# Altium PCB Digit_input.PcbDoc
Units mm, origin at the board's own origin, x right, y up, seen from the top; angles counter-clockwise.
Board outline 58 x 31.1 mm, 2 copper layers (Top Layer, Bottom Layer), stack 1.335 mm thick; 59 components, 17 nets, 128 pads, 167 vias.
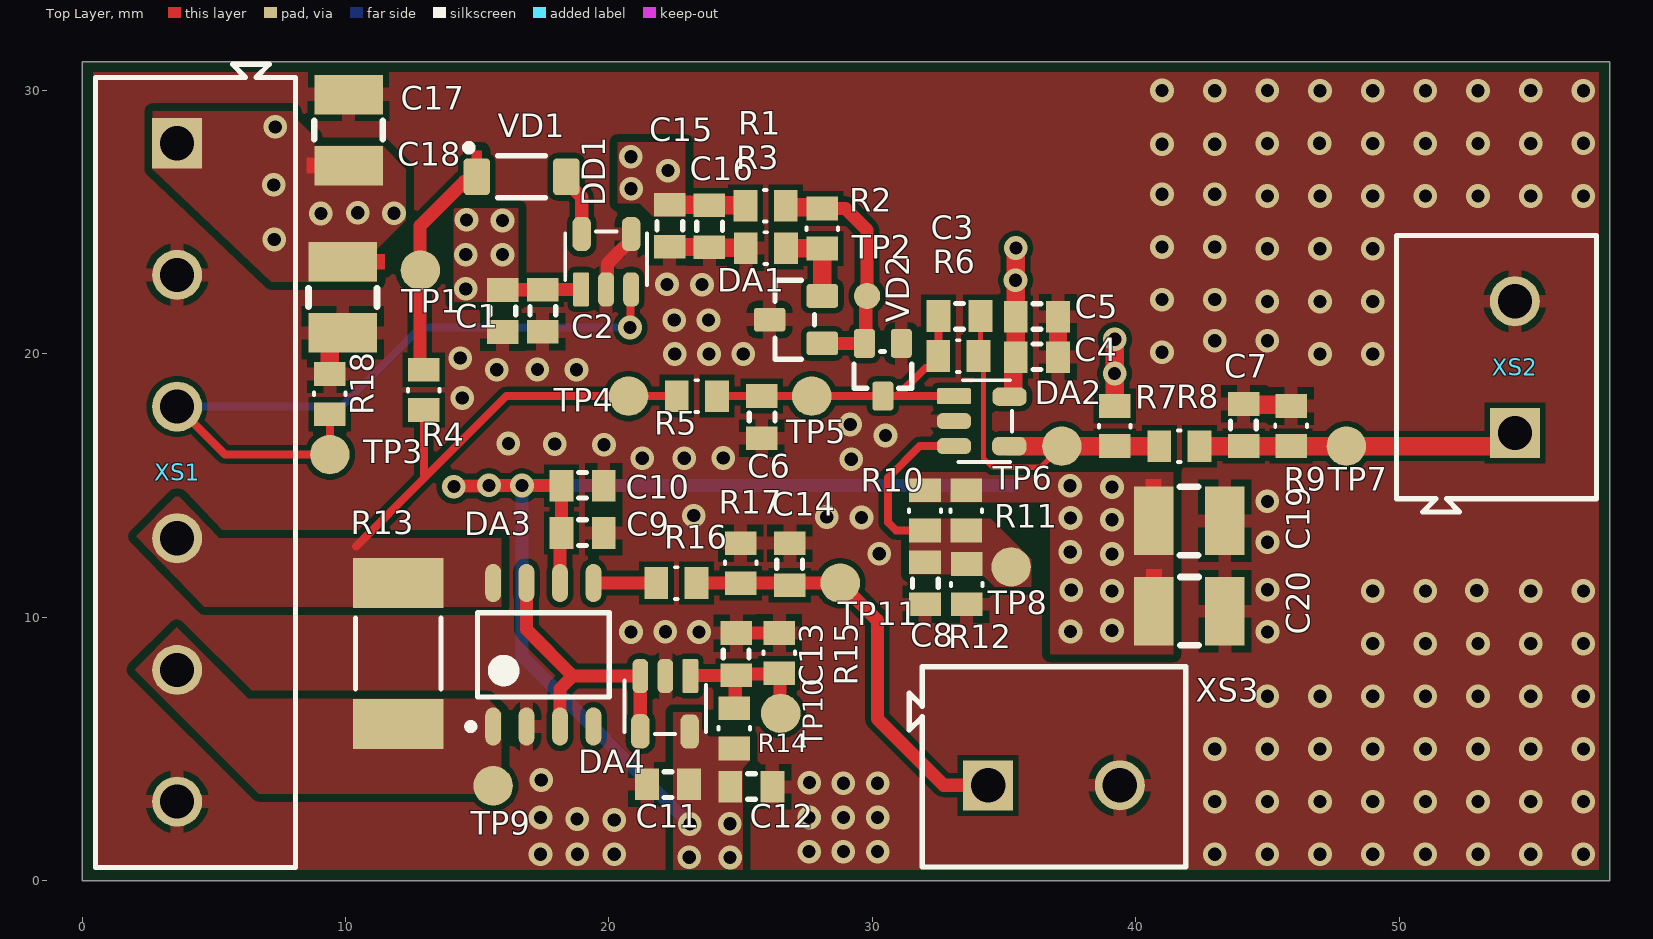
[diagram p0: Top Layer view]
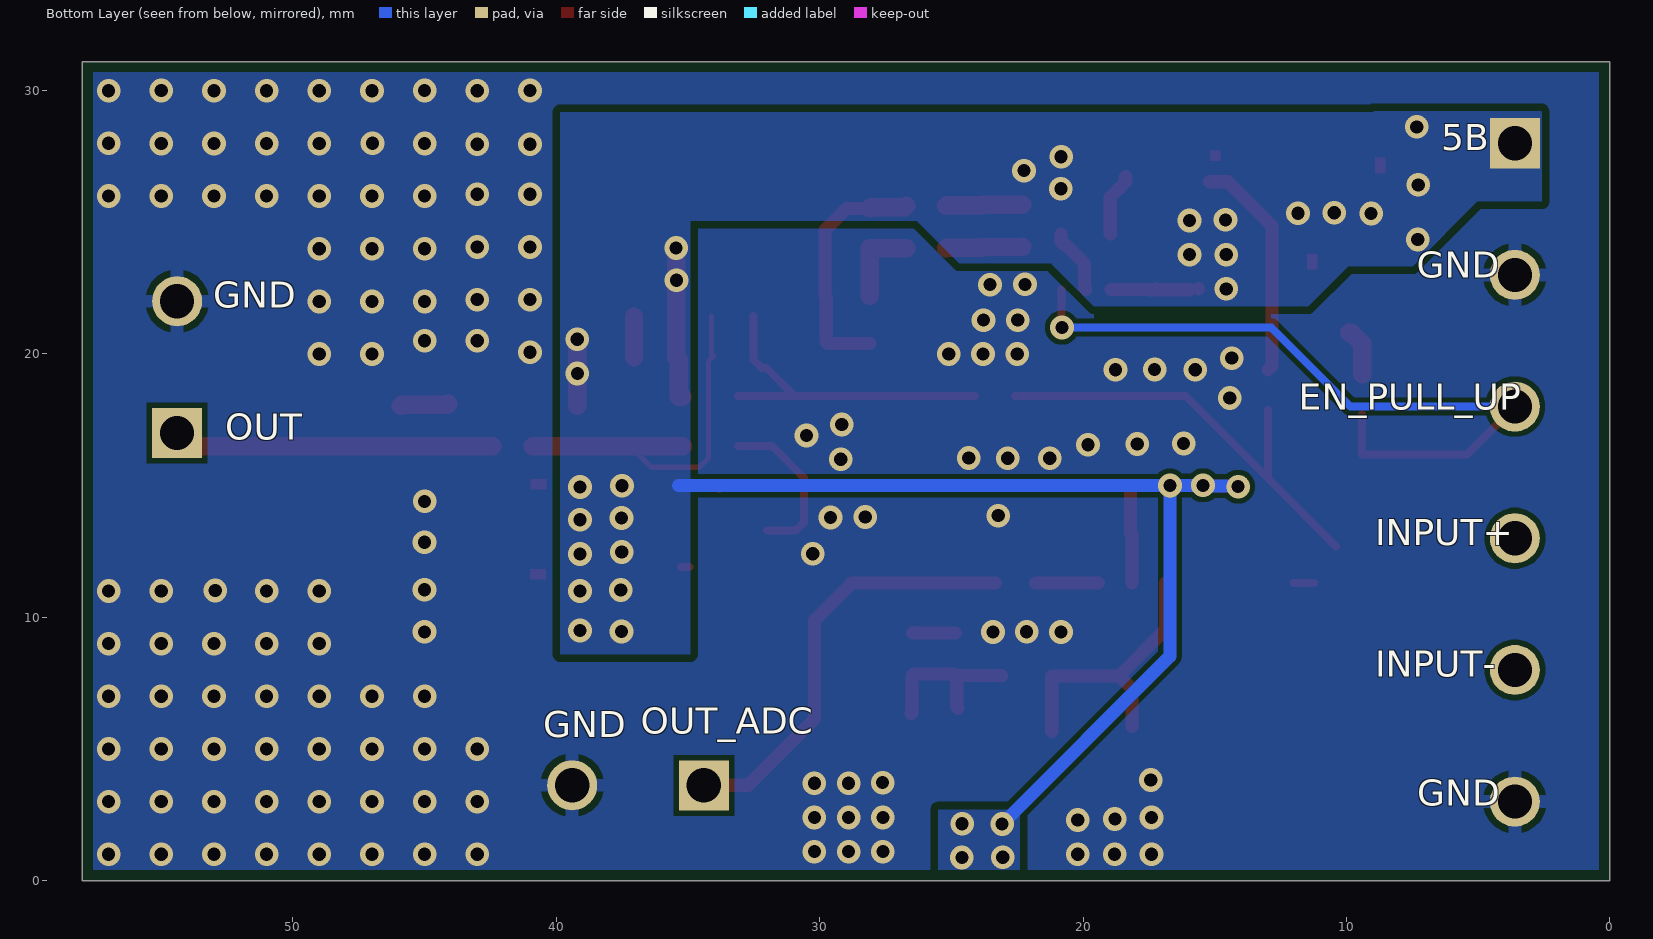
[diagram p1: Bottom Layer view, seen from below]
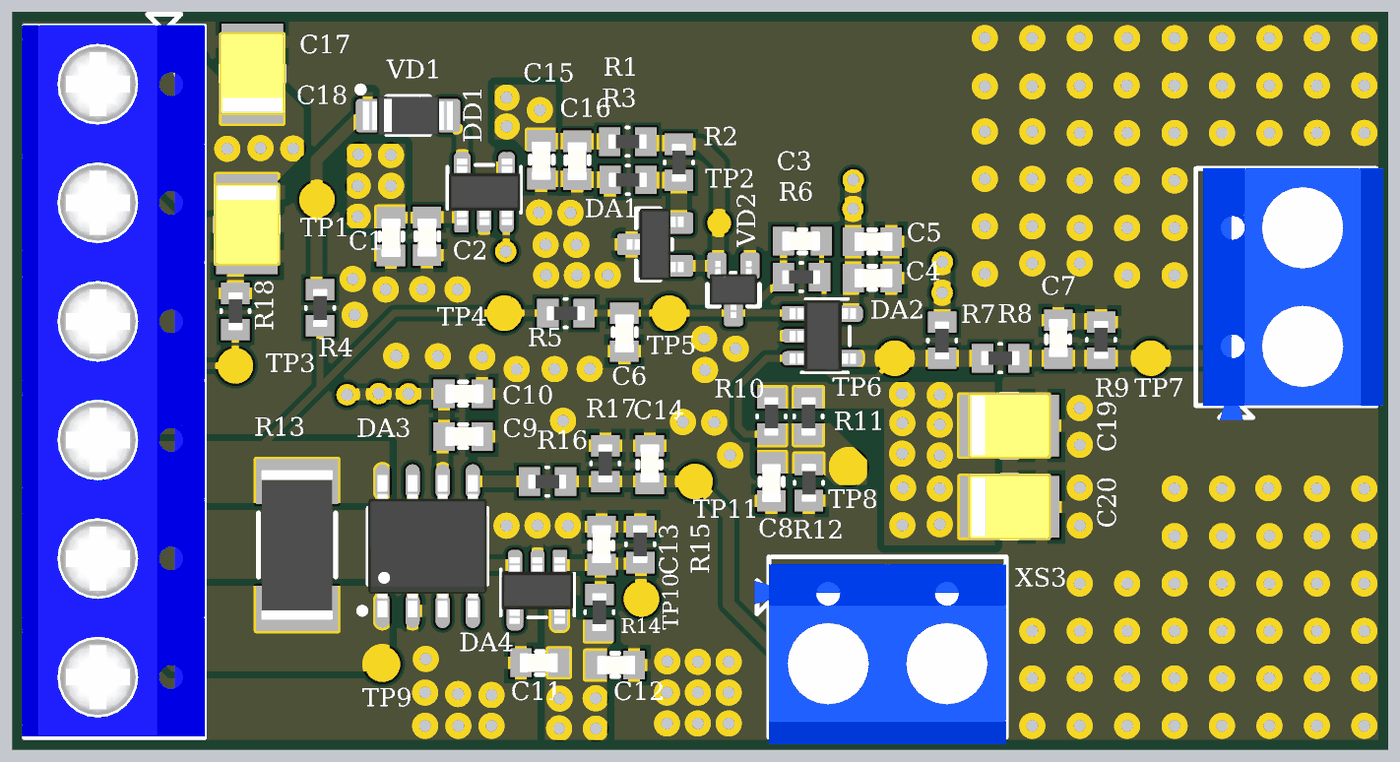
[diagram p2: 3D render of the assembled board from above, using the file's embedded part models]

## Layer stack, top to bottom
Top Solder: solder mask 0.0102, Solder Resist, Dk 3.5
Top Layer: signal copper 0.035
Dielectric 1: dielectric 1.265, FR-4, Dk 4.6
Bottom Layer: signal copper 0.035
Bottom Solder: solder mask 0.0102, Solder Resist, Dk 3.5

## Board outline
0,0 58,0 58,31.1 0,31.1

## Design rules (kind name [scope] priority, off if disabled: settings)
BoardOutlineClearance [All] p1: gap=0.4 ignorepadtopadclearanceinfootprint=FALSE except(0: Arc-SplitContinuation Track-SplitContinuation SMDPad-SplitContinuation THPad-SplitContinuation Via-SplitContinuation Fill-SplitContinuation Poly-SplitContinuation Region-SplitContinuation Text-SplitContinuation)
Clearance Clearance_INPUT+ [InNet('INPUT+') vs InNet('INPUT+')] p1: gap=0.2 ignorepadtopadclearanceinfootprint=FALSE except(0: Arc-SMDPad Arc-THPad Arc-Via Arc-Hole Track-SMDPad Track-THPad Track-Via Track-Hole SMDPad-Via SMDPad-Hole THPad-Hole Via-Hole Fill-Hole Poly-Hole Region-Hole Text-Hole; 0.254: Arc-Arc Arc-Track Arc-Text Track-Track Track-Text SMDPad-SMDPad SMDPad-THPad SMDPad-Text THPad-THPad THPad-Via THPad-Text Via-Via Via-Text Fill-Text Poly-Text Region-Text Text-Text; 0.3: Fill-Fill Fill-Poly Fill-Region Poly-Poly Poly-Region Region-Region)
Clearance Clearance_DEF [All] p2: gap=0.2 ignorepadtopadclearanceinfootprint=FALSE except(0: Arc-Hole Track-Hole SMDPad-Via SMDPad-Hole THPad-Hole Via-Hole Fill-Hole Poly-Hole Region-Hole Text-Hole; 0.1: Arc-SMDPad Arc-THPad Track-SMDPad Track-THPad; 0.254: Arc-Arc Arc-Track Arc-Text Track-Track Track-Text SMDPad-SMDPad SMDPad-THPad SMDPad-Text THPad-THPad THPad-Via THPad-Text Via-Via Via-Text Fill-Text Poly-Text Region-Text Text-Text; 0.3: Fill-Fill Fill-Poly Fill-Region Poly-Poly Poly-Region Region-Region)
Height [All] p1: minheight=0 maxheight=70 prefheight=35
MinimumSolderMaskSliver [All] p1: minsoldermaskwidth=0.1
PolygonConnect PolygonConnect_Vref_comp [InNet('Vref_comp') vs InNet('Vref_comp')] p1: thpad.connectstyle=Relief thpad.reliefconductorwidth=0.254 thpad.reliefentries=4 thpad.polygonreliefangle="90 Angle" thpad.airgapwidth=0.254 smdpad.connectstyle=Direct smdpad.reliefconductorwidth=0.254 smdpad.reliefentries=4 smdpad.polygonreliefangle="90 Angle" smdpad.airgapwidth=0.254 via.connectstyle=Relief via.reliefconductorwidth=0.254 via.reliefentries=4 via.polygonreliefangle="90 Angle" via.airgapwidth=0.254
PolygonConnect PolygonConnect_GND [InNet('GND')] p2: thpad.connectstyle=Relief thpad.reliefconductorwidth=0.508 thpad.reliefentries=4 thpad.polygonreliefangle="90 Angle" thpad.airgapwidth=0.254 smdpad.connectstyle=Relief smdpad.reliefconductorwidth=0.508 smdpad.reliefentries=4 smdpad.polygonreliefangle="90 Angle" smdpad.airgapwidth=0.254 via.connectstyle=Direct via.reliefconductorwidth=0.254 via.reliefentries=4 via.polygonreliefangle="90 Angle" via.airgapwidth=0.254
PolygonConnect PolygonConnect_5В [InNet('5В') vs InNet('5В')] p3: connectstyle=Direct reliefconductorwidth=0.254 reliefentries=4 polygonreliefangle="90 Angle" airgapwidth=0.254
PolygonConnect PolygonConnect_INPUT- [InNet('INPUT-') vs InNet('INPUT-')] p4: connectstyle=Direct reliefconductorwidth=0.254 reliefentries=4 polygonreliefangle="90 Angle" airgapwidth=0.254
PolygonConnect PolygonConnect_INPUT+ [InNet('INPUT+')] p5: connectstyle=Direct reliefconductorwidth=0.254 reliefentries=4 polygonreliefangle="90 Angle" airgapwidth=0.254
PolygonConnect PolygonConnect_1 [All] p6: connectstyle=Relief reliefconductorwidth=0.508 reliefentries=4 polygonreliefangle="90 Angle" airgapwidth=0.254
RoutingVias [All] p1: holewidth=1.2 width=2.5 viastyle="Through Hole" minholewidth=0.5 minwidth=0.8 maxholewidth=3 maxwidth=5
SilkToSolderMaskClearance [IsPad] p1: minsilkscreentomaskgap=0.15 clearancetoexposedcopper=TRUE
SolderMaskExpansion [All] p1: expansion=0.102 istentingtop=FALSE
SupplyNets "Schematic Supply Nets_1" [InNet('GND')] p1: voltage=0.000
SupplyNets "Schematic Supply Nets" [InNet('5В')] p2: voltage=0.000
Width [All] p1: maxlimit=2.5 minlimit=0.15 preferedwidth=0.8
27 further rules are at their usual default settings.

## Components (designator, comment, footprint, x,y, rotation, side; value= is the part's Value field where it differs from the comment)
C1 "100 нФ" "CAP 0603 3D" 15.96,22.43 r0 top
C2 "100 нФ" "CAP 0603 3D" 17.48,22.44 r0 top
C3 "100 пФ" "CAP 0603 3D" 34.11,21.44 r270 top
C4 "100 нФ" "CAP 0603 3D" 35.45,19.88 r90 top
C5 "100 нФ" "CAP 0603 3D" 35.45,21.41 r90 top
C6 "1 нФ" "CAP 0603 3D" 25.8,18.4 r0 top
C7 "100 пФ" "CAP 0603 3D" 44.1,16.5 r180 top
C8 "100 нФ" "CAP 0603 3D" 32,12.09 r0 top
C9 "100 нФ" "CAP 0603 3D" 18.2,13.2 r90 top
C10 "100 нФ" "CAP 0603 3D" 18.2,15 r90 top
C11 "100 нФ" "CAP 0603 3D" 23.04,3.66 r270 top
C12 "100 нФ" "CAP 0603 3D" 24.61,3.56 r90 top
C13 "100 нФ" "CAP 0603 3D" 24.84,7.8 r180 top
C14 "1 нФ" "CAP 0603 3D" 26.87,11.214 r180 top
C15 "100 нФ" "CAP 0603 3D" 22.3,25.67 r0 top
C16 "100 нФ" "CAP 0603 3D" 23.81,25.65 r0 top
C17 "15 мкФ" "Tant B"#1 10.11,27.25 r180 top
C18 "15 мкФ" "Tant B"#1 9.89,23.4 r0 top
C19 "15 мкФ" "Tant B"#2 40.78,13.66 r90 top
C20 "15 мкФ" "Tant B"#1 40.79,10.23 r90 top
DA1 "TL431" "SOT-23-3 (132)" 28.1,20.4 r90 top
DA2 "LMV331" SOT-23-5#1 33.125,18.4 r0 top
DA3 "AD8418" "SOIC-8 150mil" 17.505,8.575 r90 top
DA4 "MCP6001UT" SOT-23-5#1 23.09,7.745 r270 top
DD1 "UCC27517" SOT-23-5#2 18.94,22.475 r90 top
R1 "100 Ом" "Res_0603 3D" 25.186,25.63 r90 top
R2 "1 кОм" "Res_0603 3D" 28.1,24 r180 top
R3 "3 кОм" "Res_0603 3D" 25.196,24.02 r90 top
R4 "2 кОм" "Res_0603 3D" 12.97,17.87 r180 top
R5 "15 кОм" "Res_0603 3D" 22.576,18.4 r90 top
R6 "1 МОм" "Res_0603 3D" 32.506,19.92 r90 top
R7 "3 кОм" "Res_0603 3D" 39.2,16.5 r180 top
R8 "10 кОм" "Res_0603 3D" 40.9,16.5 r90 top
R9 "20 кОм" "Res_0603 3D" 45.9,18.024 r0 top
R10 "13 кОм" "Res_0603 3D" 32,13.296 r180 top
R11 "1 МОм" "Res_0603 3D" 33.56,13.296 r180 top
R12 "13 кОм" "Res_0603 3D" 33.58,10.496 r180 top
R13 "0.1 Ом" "Res_2512 3D" 12.05,5.975 r180 top
R14 "1 кОм" "Res_0603 3D" 24.75,6.542 r0 top
R15 "1 кОм" "Res_0603 3D" 26.47,9.404 r0 top
R16 "2 кОм" "Res_0603 3D" 21.8,11.3 r90 top
R17 "3.83 кОм" "Res_0603 3D" 25,12.814 r0 top
R18 "10 кОм" "Res_0603 3D" 9.4,19.234 r0 top
TP1 "TP" Test_Point_1_5mm 12.84,23.18 r90 top
TP2 "TP" Test_Point_1mm 29.8,22.2 r90 top
TP3 "TP" Test_Point_1_5mm 9.4,16.18 r90 top
TP4 "TP" Test_Point_1_5mm 20.743,18.4 r90 top
TP5 "TP" Test_Point_1_5mm 27.7,18.4 r0 top
TP6 "TP" Test_Point_1_5mm 37.2,16.5 r90 top
TP7 "TP" Test_Point_1_5mm 48,16.5 r90 top
TP8 "TP" Test_Point_1_5mm 35.27,11.91 r90 top
TP9 "TP" Test_Point_1_5mm 15.6,3.6 r90 top
TP10 "TP" Test_Point_1_5mm 26.52,6.35 r90 top
TP11 "TP" Test_Point_1_5mm 28.78,11.3 r90 top
VD1 "BAS70H" SOD-123f 14.98,26.73 r90 top
VD2 "BAS70-04W" SOT-323 31.1,20.4 r180 top
XS1 "KF-301-6P" Degson_DG301-5.0-06P-1X 3.6,28 r270 top
XS2 "KF-301-2P" Degson_DG301-5.0-02P-1X 54.4,17 r90 top
XS3 "KF-301-2P" Degson_DG301-5.0-02P-1X 34.398,3.62 r0 top

## Footprints (in the part's own frame and the unit in brackets; to place one, negate y for a bottom-side part, rotate by r counter-clockwise, add the part's x,y. Pads: shape width x height; smd on the part's side, far side on the other; paste and mask are expansions set on the pad)
"CAP 0603 3D" [mm] "Конденсатор керамический ЧИП (SMD)"
  rect 1.2x0.9 smd: 1(0,0) 2(0,-1.6)
  silkscreen extent -0.48,-0.95 0.5,-0.65, body extent -0.4,-1.65 0.4,-0.05, height 0.86
Degson_DG301-5.0-02P-1X [mm]
  rect 1.9x1.9 hole 1.3 mask+0.102: 1(0,0)
  round 1.9 hole 1.3 mask+0.102: 2(5,0)
  silkscreen extent -3,-3.1 7.5,4.5, body extent -3.1,-3.4 7.5,4.2, height 10
Degson_DG301-5.0-06P-1X [mm]
  rect 1.9x1.9 hole 1.3 mask+0.102: 1(0,0)
  round 1.9 hole 1.3 mask+0.102: 2(5,0) 3(10,0) 4(15,0) 5(20,0) 6(25,0)
  silkscreen extent -3,-3.1 27.5,4.5, body extent -2.55,-3.2 27.45,4.5, height 10.25
"Res_0603 3D" [mm] "Резистор ЧИП (SMD)"
  rect 1.2x0.9 smd: 1(0,0) 2(0,-1.524)
  silkscreen extent -0.6,-0.8 0.6,-0.7, body extent -0.3,-1.55 0.3,0.05, height 0.63
"Res_2512 3D" [mm] "Резистор ЧИП (SMD)"
  rect 3.45x1.9 smd: 1(0.05,0.025) 2(0.05,-5.325)
  silkscreen extent -1.58,-4 1.67,-1.3, body extent -1.45,-5.8 1.55,0.5, height 0.7
SOD-123f [mm]
  rrect30% 1.4x1 smd: 1(0,0) 2(0,-3.4)
  Top Layer region: 0.599,-0.199 0.999,-0.199 0.999,0.201 0.599,0.201
  silkscreen extent -0.8,-2.6 1.23,0.43, body extent -0.8,-3.6 0.8,0.2, height 1.15
"SOIC-8 150mil" [mm]
  oval 1.45x0.6 smd: 1(-2.725,1.905) 2(-2.725,0.635) 3(-2.725,-0.635) 4(-2.725,-1.905) 5(2.725,-1.905) 6(2.725,-0.635) 7(2.725,0.635) 8(2.725,1.905)
  silkscreen extent -2.85,-2.5 1.6,2.88, body extent -3,-2.5 3,2.5, height 1.75
"SOT-23-3 (132)" [mm] "TO-236AB,   SuperSOT-3,  SOT-346,  KT-46,  SC-59,  SMT3"
  rrect25% 0.9x1.2 smd: 1(0,0) 2(1.8,0) 3(0.9,2)
  silkscreen extent -0.6,0.3 2.4,1.8, body extent -0.6,-0.2 2.4,2.2, height 1
SOT-23-5#1 [mm]
  rrect20% 1.3x0.6 smd: 1(-0.025,0)
  rrect70% 1.3x0.6 smd: 2(-0.025,-0.95) 3(-0.025,-1.9)
  rrect70% 1.3x0.7 smd: 4(2.075,-1.9) 5(2.083,-0.025)
  silkscreen extent 0.15,-2.5 2.17,0.6, body extent -0.36,-2.47 2.44,0.53, height 1
SOT-23-5#2 [mm]
  rrect20% 1.3x0.6 smd mask+0.102: 1(-0.025,0)
  rrect70% 1.3x0.6 smd mask+0.102: 2(-0.025,-0.95) 3(-0.025,-1.9)
  rrect70% 1.3x0.7 smd mask+0.102: 4(2.075,-1.9) 5(2.083,-0.025)
  silkscreen extent 0.15,-2.5 2.17,0.6, body extent -0.36,-2.47 2.44,0.53, height 1
SOT-323 [mm] "SC-70-3"
  rrect30% 0.8x1.1 smd: 1(0,0) 2(0.7,2) 3(1.4,0)
  silkscreen extent -0.4,0.3 1.8,1.7, body extent -0.3,-0.2 1.7,2.2, height 1
"Tant B"#1 [mm] "Конденсатор тантал ЧИП (SMD)"
  rect 2.6x1.5 smd: 1(0,0.1) 2(0,-2.6)
  Top Layer region: 1.2,0.4 1.2,-0.2 1.6,-0.2 1.6,0.4
  silkscreen extent -1.3,-1.6 1.3,-0.9, body extent -1.4,-3 1.4,0.5, height 1.9
"Tant B"#2 [mm] "Конденсатор тантал ЧИП (SMD)"
  rect 2.6x1.5 smd: 1(0,0.1)
  rect 2.6x1.5 smd paste+0: 2(0,-2.6)
  Top Layer region: 1.2,0.4 1.2,-0.2 1.6,-0.2 1.6,0.4
  silkscreen extent -1.3,-1.6 1.3,-0.9, body extent -1.4,-3 1.4,0.5, height 1.9
Test_Point_1_5mm [mm]
  round 1.5 smd paste-0.75: 1(0,0)
  body extent -0.75,-0.75 0.75,0.75, height 0.03
Test_Point_1mm [mm]
  round 1 smd paste-0.5: 1(0,0)
  body extent -0.5,-0.5 0.5,0.5, height 0.03

## Part data
C1 C2 C3 C4 C5 C6 C7 C8 C9 C10 C11 C12 C13 C14 C15 C16: library part C, "Конденсатор керамика"
C17 C18 C19 C20: library part "C T", "Конденсатор тантал"
DA1: library part "TL431 (SOT-23-3)", "Управляемый стабилитрон Uref=2.5V"
DA4: library part LMV331
R1 R2 R3 R4 R5 R6 R7 R8 R9 R10 R11 R12 R13 R14 R15 R16 R17 R18: library part R, "Резисторы плёночные (SMD; МЛТ; С2-33Н; MP9xxx)"
VD1: library part "Диод Шот. х1", "Диод Шоттки одиночный"
VD2: library part "Диод Шот  А1&К2 (2)", "Диод Шоттки х2 Общ. катод-анод"

## Via types
v1: diameter 0.9, hole 0.5, Top Layer to Bottom Layer, 167 vias

## Nets (pads, with @x,y where several pads share a name; then routed paths per layer and width w, separated by ;. In a path a pad name is that pad's centre, name@x,y a point inside that pad or via, vN(x,y) a via of type N, cw(c..) or ccw(c..) an arc to the next point about the centre after c; other vN are vias at no path point)
4В5: DA1.1 R1.2 R2.2 TP2.1 VD2.3 | length 9.4
  Top Layer w0.3: VD2.3 VD2.3@29.75,20.45 ; TP2.1@29.75,22.15 TP2.1
  Top Layer w0.5: DA1.1 VD2.3 ; R2.2 28.976,25.524 29.8,24.7 TP2.1 ; VD2.3@29.75,20.45 TP2.1@29.75,22.15
  Top Layer w0.7: R1.2 26.763,25.577 28.047,25.577 R2.2
5В: C1.1 C2.1 C4.1 C5.1 C9.1 C10.1 C11.1 C12.1 C15.1 C16.1 C17.1 C18.1 C19.1 C20.1 DA2.5 DA3.6 DA4.5 DD1.1 R1.1 R7.2 R10.2 R11.2 R14.2 XS1.1 | length 59
  Top Layer w0.2: R11.2@33.8,14.824 R11.2@33.849,14.873
  Top Layer w0.3: C9.1@18.14,13.14 C9.1
  Top Layer w0.5: v1(14.11,14.96) 14.135,14.985 15.415,14.985 v1(15.44,15.01) 15.445,15.005 16.695,15.005 v1(16.7,15) C10.1 C9.1 ; C1.1@15.61,22.48 C1.1@15.62,22.47 ; C1.1 15.965,22.435 C2.1@17.475,22.435 ; C2.1@17.2,22.47 C2.1@17.21,22.48 ; C2.1 17.485,22.445 18.935,22.445 DD1.1 ; DA3.6 C9.1@18.14,13.14
  Top Layer w0.7: C15.1 22.31,25.66 23.8,25.66 C16.1 23.82,25.64 25.176,25.64 R1.1 ; DA2.5 35.35,18.375 35.35,19.78 C4.1 C5.1 35.445,21.415 35.445,22.795 v1(35.44,22.8) 35.445,22.805 35.445,24.015 v1(35.45,24.02) ; R7.2 v1(39.2,19.26) 39.204,19.264 39.204,20.553 v1(39.208,20.557)
  Bottom Layer w0.5: v1(14.11,14.96) 14.135,14.985 15.415,14.985 v1(15.44,15.01) v1(16.7,15) ; v1(23.07,2.15) 16.7,8.52 v1(16.7,15) ; 35.365,15 v1(16.7,15)
  other v1: 23.05,0.89 24.6,0.88 24.59,2.16 37.523,9.457 39.1,9.5 39.1,11 37.553,11.037 39.1,12.4 37.513,12.477 39.1,13.7 37.523,13.767 39.1,14.95 37.503,14.997 14.56,22.47 14.56,23.77 15.96,23.77 7.29,24.342 15.96,25.07 14.588,25.09 9.06,25.33 10.46,25.36 11.84,25.34 20.84,26.27 7.27,26.42 22.24,26.96 20.83,27.49 7.33,28.622
EN_PULL_UP: DD1.3 R18.2 TP3.1 XS1.3 | length 28
  Top Layer w0.3: XS1.3 5.42,16.18 TP3.1 R18.2 ; v1(20.8,21) 20.82,21.02 20.82,22.43 DD1.3
  Bottom Layer w0.3: XS1.3 9.85,18 12.85,21 v1(20.8,21)
GND: C1.2 C2.2 C4.2 C5.2 C6.2 C7.2 C8.2 C9.2 C10.2 C11.2 C12.2 C13.2 C14.2 C15.2 C16.2 C17.2 C18.2 C19.2 C20.2 DA1.3 DA2.2 DA3.2 DA4.2 DD1.2 DD1.4 R3.1 R9.1 R12.1 R15.1 R17.1 R18.1 VD2.1 XS1.2 XS1.6 XS2.2 XS3.2 | length 12.3
  Top Layer w0.5: DD1.2 19.94,22.5 19.94,23.43 20.66,24.15 20.74,24.15 20.84,24.25 DD1.4 ; C13.2 24.842,9.402 26.468,9.402 R15.1 ; R15.1@26.378,9.422 R15.1@26.38,9.424
  Top Layer w0.7: R18.1 9.4,20.4 9.8,20.8 C18.2 ; C15.2 22.31,24.06 23.8,24.06 C16.2 23.825,24.035 25.181,24.035 R3.1 ; C4.2 C5.2 ; C7.2 44.138,18.062 45.862,18.062 R9.1
  other v1: 17.4,1 18.8,1 20.2,1 43,1 45,1 47,1 49,1 51,1 53,1 55,1 57,1 27.6,1.1 28.9,1.1 30.2,1.1 20.2,2.3 18.79,2.34 17.4,2.4 27.6,2.4 28.9,2.4 30.2,2.4 43,3 45,3 47,3 49,3 51,3 53,3 55,3 57,3 27.61,3.72 28.9,3.7 30.2,3.7 17.43,3.82 43,5 45,5 47,5 49,5 51,5 53,5 55,5 57,5 45,7 47,7 49,7 51,7 53,7 55,7 57,7 49,9 51,9 53,9 55,9 57,9 20.833,9.438 22.14,9.45 23.42,9.44 45.007,9.446 49,11 51,11 55,11 57,11 52.953,11.02 45.007,11.046 30.26,12.41 45.007,12.846 29.59,13.79 28.27,13.81 23.218,13.86 45,14.4 29.2,16 21.26,16.04 22.86,16.04 24.34,16.05 19.81,16.55 17.94,16.58 16.18,16.6 30.5,16.9 29.162,17.322 14.43,18.33 15.74,19.4 17.28,19.41 18.77,19.4 14.35,19.84 22.5,20 23.8,20 25.1,20 47,19.994 49,19.994 41.002,20.062 43,20.5 45,20.5 22.479,21.282 23.779,21.282 45,21.994 47,21.994 49,21.994 41.002,22.062 43.002,22.062 22.2,22.64 23.53,22.63 45,23.994 47,23.994 49,23.994 41.002,24.062 43.002,24.062 45,25.994 47,25.994 49,25.994 51,25.994 53,25.994 55,26 57,26 41.002,26.062 43.002,26.062 41.002,27.962 43.002,27.962 45,27.994 46.981,28.001 49,27.994 51,27.994 53,27.994 55,27.994 57,28 41,30 43,29.994 45,30 47,29.994 49,29.994 51,29.994 53,29.994 55,30 57,29.994
INPUT+: DA3.8 R4.1 R5.1 R13.2 TP4.1 XS1.4 | length 17.9
  Top Layer w0.3: 10.39,12.69 12.97,15.27 ; R13.2@11.225,11.3 R13.2 ; R4.1 12.97,15.27 ; R5.1 TP4.1 16.1,18.4 12.97,15.27
INPUT-: DA3.1 R13.1 TP9.1 XS1.5
NetC3_2: C3.2 C6.1 DA2.1 R5.2 R6.1 TP5.1 VD2.2 | length 12.6
  Top Layer w0.3: R5.2 C6.1 TP5.1 VD2.2 30.96,18.4 ; R6.1@32.506,19.77 32.206,19.47 32.03,19.47 30.96,18.4 ; R6.1 32.51,19.924 C3.2 ; DA2.1 30.96,18.4
NetC13_1: C13.1 DA4.1 R14.1 R15.2 TP10.1 | length 6.2
  Top Layer w0.5: DA4.1 23.105,7.785 C13.1@24.825,7.785 ; R14.1 24.795,6.587 24.795,7.755 C13.1@24.825,7.785 ; TP10.1 26.495,6.375 26.495,7.775 26.43,7.84 24.88,7.84 C13.1 C13.1@24.825,7.785
NetDA1_2: DA1.2 R2.1 R3.2 | length 3.2
  Top Layer w0.7: R3.2 26.73,24.01 28.09,24.01 R2.1 DA1.2
NetDA3_5: DA3.5 R16.1 | length 2.4
  Top Layer w0.5: DA3.5 R16.1
NetDD1_5: DD1.5 VD1.2 | length 2.4
  Top Layer w0.5: VD1.2 18.38,26.53 18.63,26.28 18.643,26.28 18.965,25.958 DD1.5
NetR4_2: R4.2 TP1.1 VD1.1 | length 8.6
  Top Layer w0.5: TP1.1@12.82,23.18 12.82,19.544 R4.2 ; TP1.1@12.827,23.193 12.827,24.866 14.501,26.54 VD1.1@15.19,26.54
OUT: C7.1 R8.2 R9.2 TP7.1 XS2.1 | length 12.2
  Top Layer w0.3: XS2.1@53.9,16.5 XS2.1
  Top Layer w0.7: R8.2 C7.1 R9.2 TP7.1 XS2.1@53.9,16.5
OUT_ADC: C14.1 R16.2 R17.2 TP11.1 XS3.1 | length 16.5
  Top Layer w0.5: R16.2 26.87,11.3 TP11.1 30.19,9.89 30.19,6.14 32.71,3.62 XS3.1
OUT_COMP: C3.1 DA2.4 R6.2 R7.1 R8.1 TP6.1 | length 14.7
  Top Layer w0.2: C3.1 34.11,20 R6.2 34.22,19.73 34.22,16.04 34.56,15.7 36.4,15.7 TP6.1
  Top Layer w0.7: DA2.4 TP6.1 R7.1 R8.1
Vref: DA3.3 DA3.7 DA4.3 DA4.4 | length 11
  Top Layer w0.5: DA3.7 16.87,9.53 18.63,7.77 ; DA3.3 18.14,7.28 18.63,7.77 ; DA4.4 DA4.3 18.63,7.77
Vref_comp: C8.1 DA2.3 R10.1 R11.1 R12.2 TP8.1 | length 6.5
  Top Layer w0.3: R10.1@32,13.3 30.9,13.3 30.6,13.6 30.6,15.3 31.8,16.5 DA2.3 ; TP8.1@34.945,11.91 TP8.1
pads on no net: DA3.4

## Polygon pours and split planes (outlines as drawn)
GND on Top Layer "GND_L01_P024" (solid, remove dead copper, pour order 24): 0,0 0,31.1 58,31.1 58,0
5В on Top Layer "5В_L01_P023" (solid, pour order 23): 11.19,22.75 7.17,22.75 2.67,27.02 2.67,29.21 8.02,29.21 8.02,29.04 8.81,28.25 8.81,27.9 11.41,27.9 12.29,27.02 12.29,25.08 11.19,23.98
5В on Top Layer "5В_L01_P020" (solid, pour order 20): 22.9,25.22 21.66,25.22 21.16,25.72 20.34,25.72 20.34,28.04 22.9,28.04
5В on Top Layer "5В_L01_P019" (solid, pour order 19): 31.41,15.5 31.41,14.37 36.76,14.37 36.76,8.6 41.44,8.6 41.43,8.61 41.43,15.5
Vref_comp on Top Layer "VREF_COMP_L01_P018" (solid, remove dead copper, pour order 18): 31.4,13.75 31.41,13.75 34.49,13.75 36.03,12.21 36.03,11.16 34.64,11.16 34.16,11.64 31.4,11.64
5В on Top Layer "5В_L01_P015" (solid, pour order 15): 16.56,21.98 14.1,21.98 14.1,25.49 14.15,25.54 16.56,25.54
INPUT- on Top Layer "INPUT-_L01_P003" (solid, pour order 3): 15.9,3.3 6.7,3.3 1.987,8.013 3.587,9.613 6.3,6.9 15.4,6.9 15.9,6.4
5В on Top Layer "5В_L01_P001" (solid, pour order 12): 22.447,0.033 22.447,6.386 23.492,6.386 23.53,6.348 23.53,5.75 23.81,5.47 25.35,5.47 25.35,4.55 25.07,4.27 25.07,0 25.04,0.03 22.45,0.03
INPUT+ on Top Layer "INPUT+_L01_P000" (solid, pour order 0): 15.9,13 5.192,13 3.607,14.647 2.052,13.069 4.638,10.4 15.9,10.4
GND on Bottom Layer "GND_L02_P025" (solid, remove dead copper, pour order 25): 0,0 0,31.1 58,31.1 58,0
5В on Bottom Layer "5В_L02_P016" (solid, pour order 16): 9.93,23.33 7.485,23.33 5.025,25.79 2.58,25.79 2.58,29.17 2.54,29.21 8.95,29.21 8.99,29.17 20.21,29.17 39.85,29.17 39.85,8.6 34.92,8.6 34.92,25.06 26.31,25.06 24.7,23.45 21.18,23.45 21.18,23.4 19.59,21.81 11.45,21.81
5В on Bottom Layer "5В_L02_P011" (solid, pour order 11): 25.5,0 25.5,2.7 24.9,2.7 22.4,2.7 22.4,0

## Silkscreen, mask and mechanical layers (free items; w line width, h text height)
Bottom Overlay:
  text "5В" at 6.4,27.4 h1.7
  text "GND" at 7.32,22.55 h1.7
  text "GND" at 53.027,21.415 h1.7
  text "EN_PULL_UP" at 11.8,17.536 h1.7
  text "OUT" at 52.578,16.399 h1.7
  text "INPUT+" at 8.9,12.4 h1.7
  text "INPUT-" at 8.9,7.4 h1.7
  text "OUT_ADC" at 36.8,5.236 h1.7
  text "GND" at 40.5,5.1 h1.7
  text "GND" at 7.3,2.5 h1.7
Рамка:
  the board outline again, w0.254